# Altium PCB MPPT_Power_Board.PcbDoc (part 1 of 2)
Units mm, origin at the board's own origin, x right, y up, seen from the top; angles counter-clockwise.
Board outline 137.01 x 102.01 mm, 2 copper layers (Top Layer, Bottom Layer), stack 2.14 mm thick; 111 components, 74 nets, 392 pads, 366 vias.
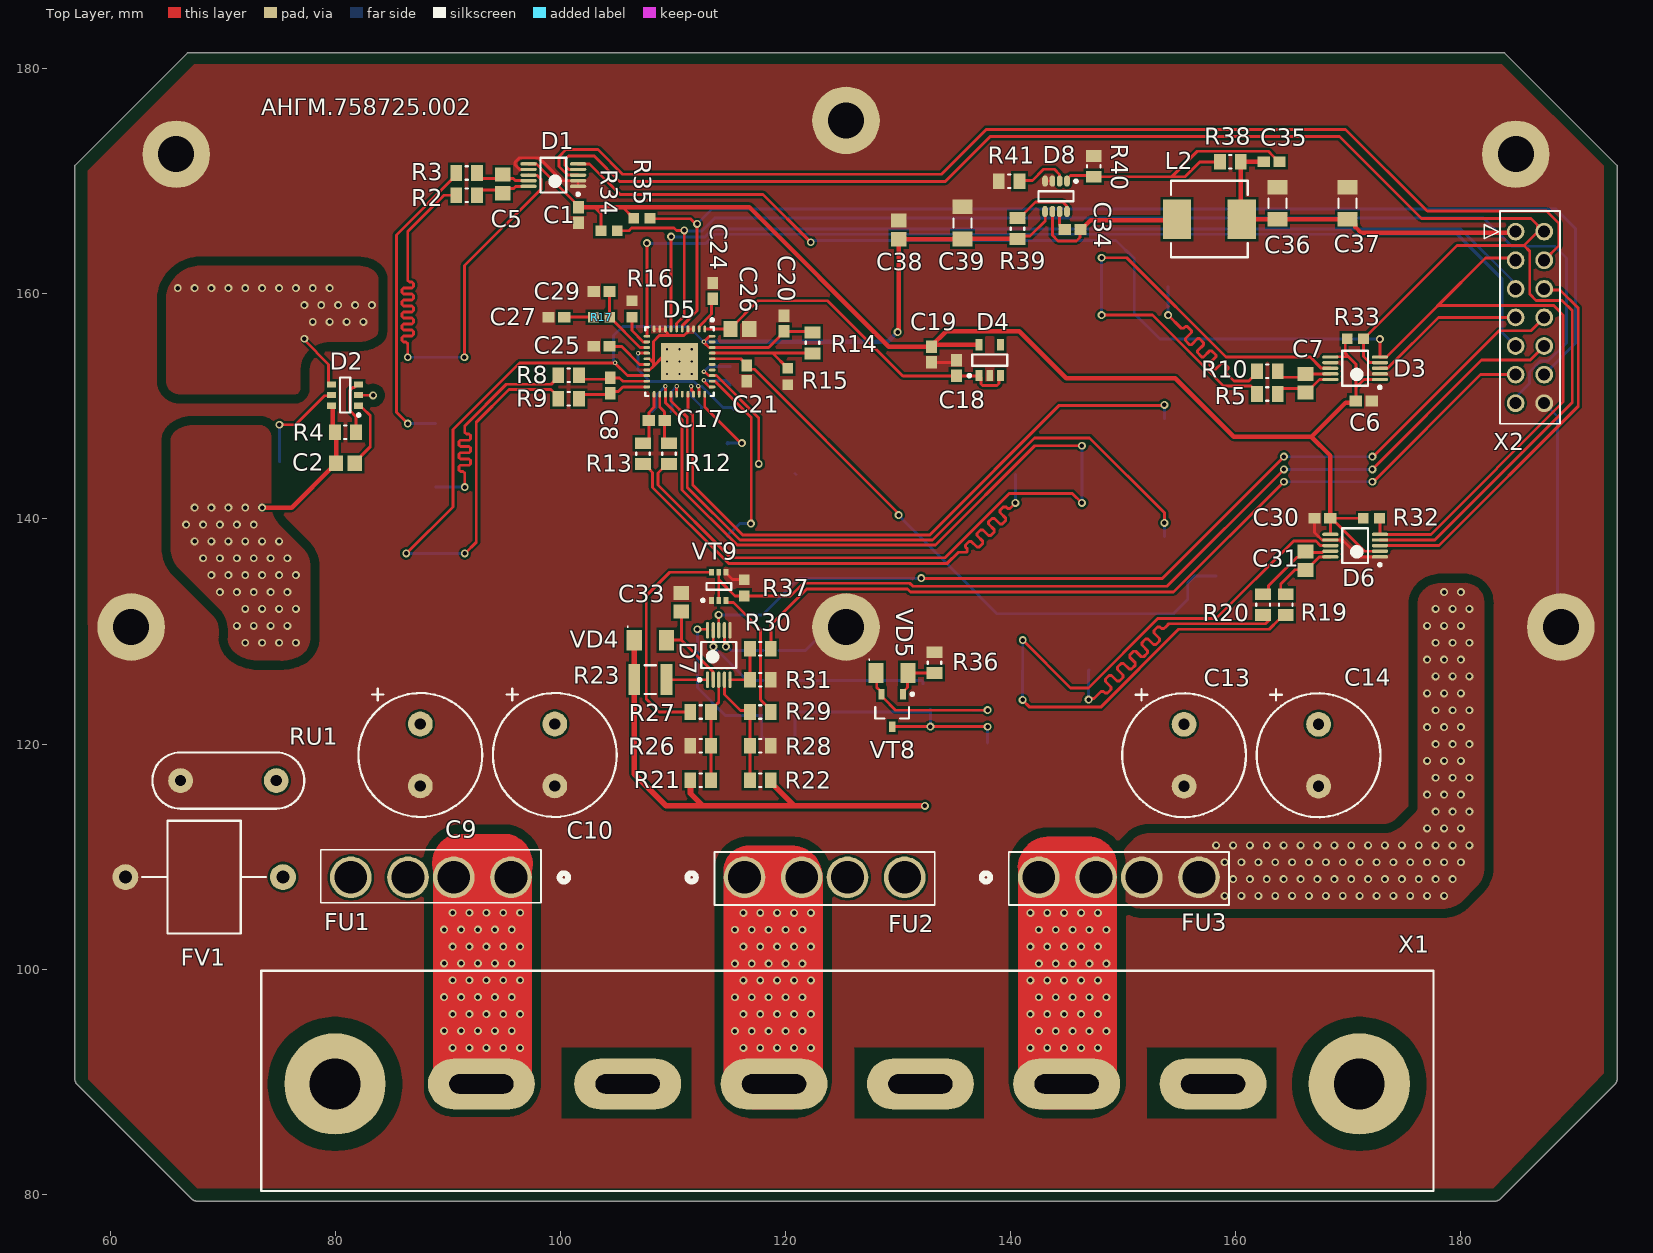
[diagram p0: Top Layer view]
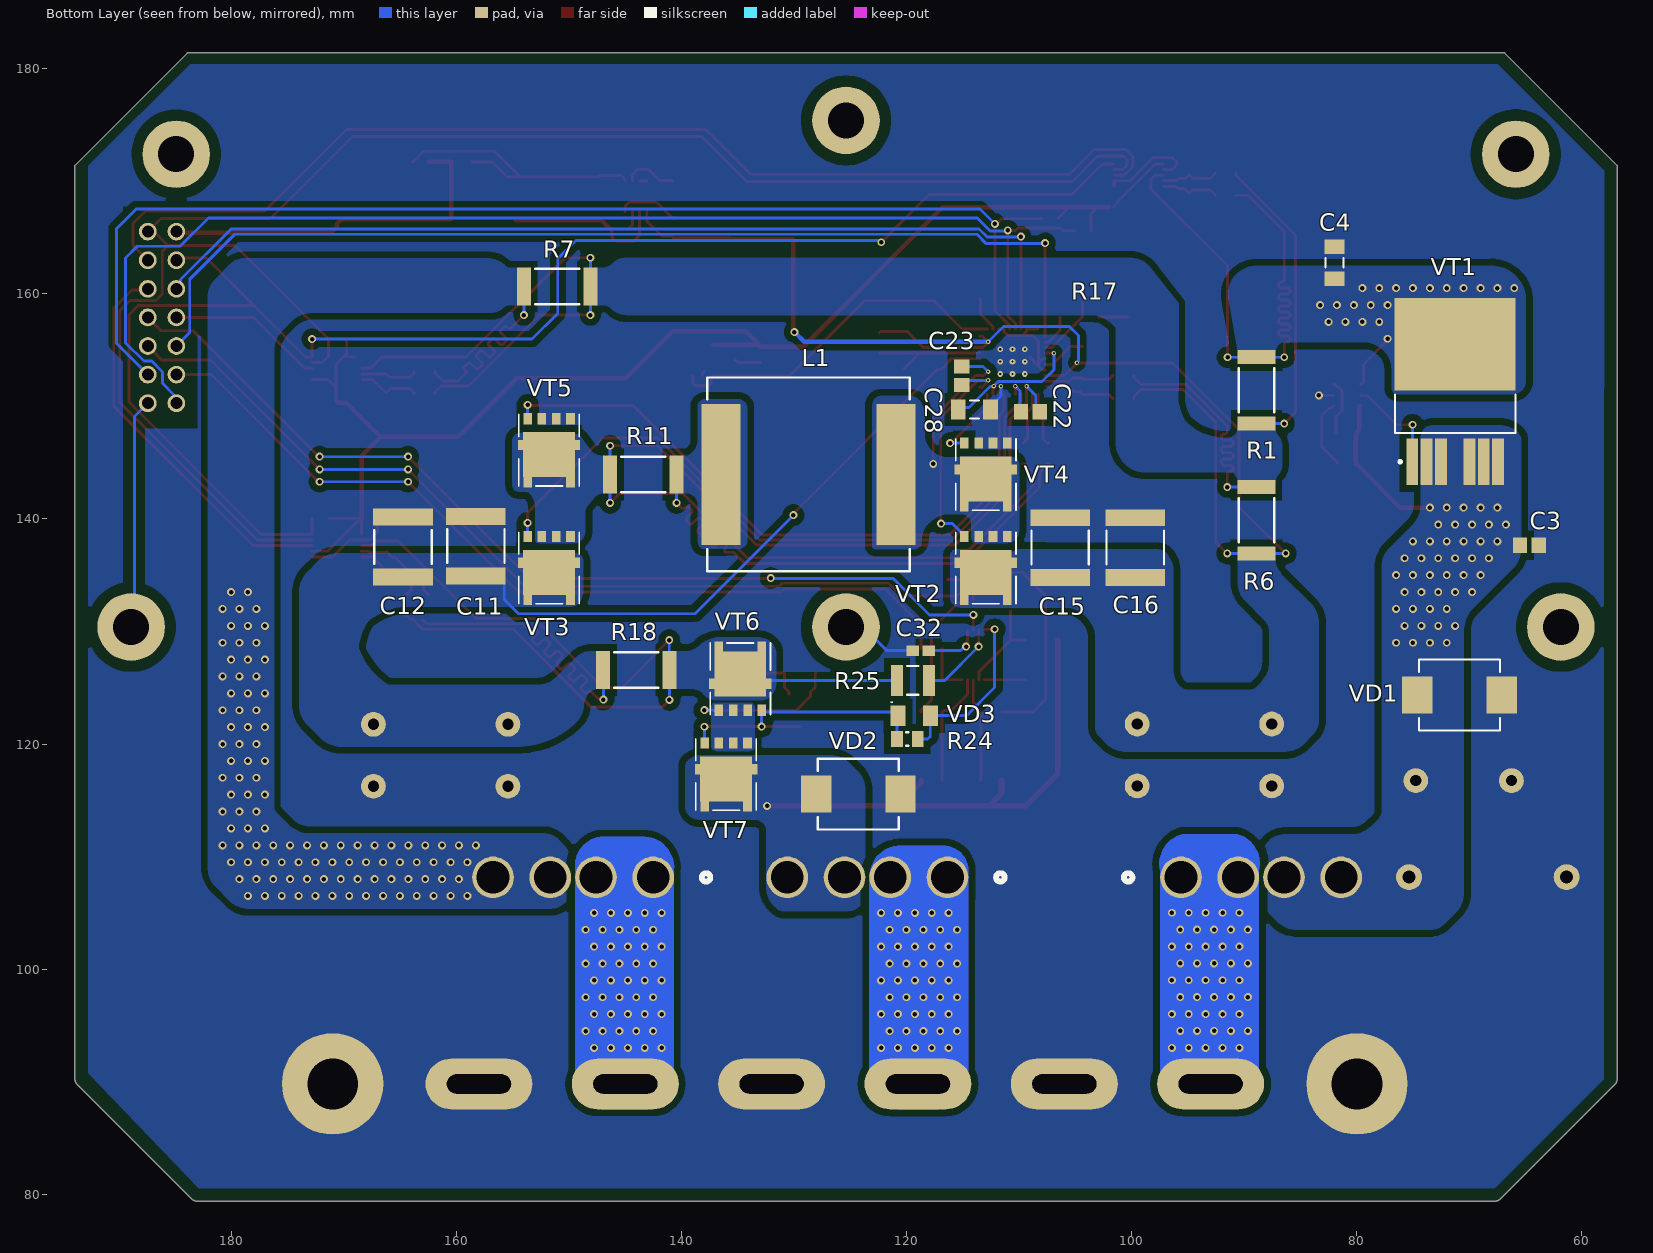
[diagram p1: Bottom Layer view, seen from below]
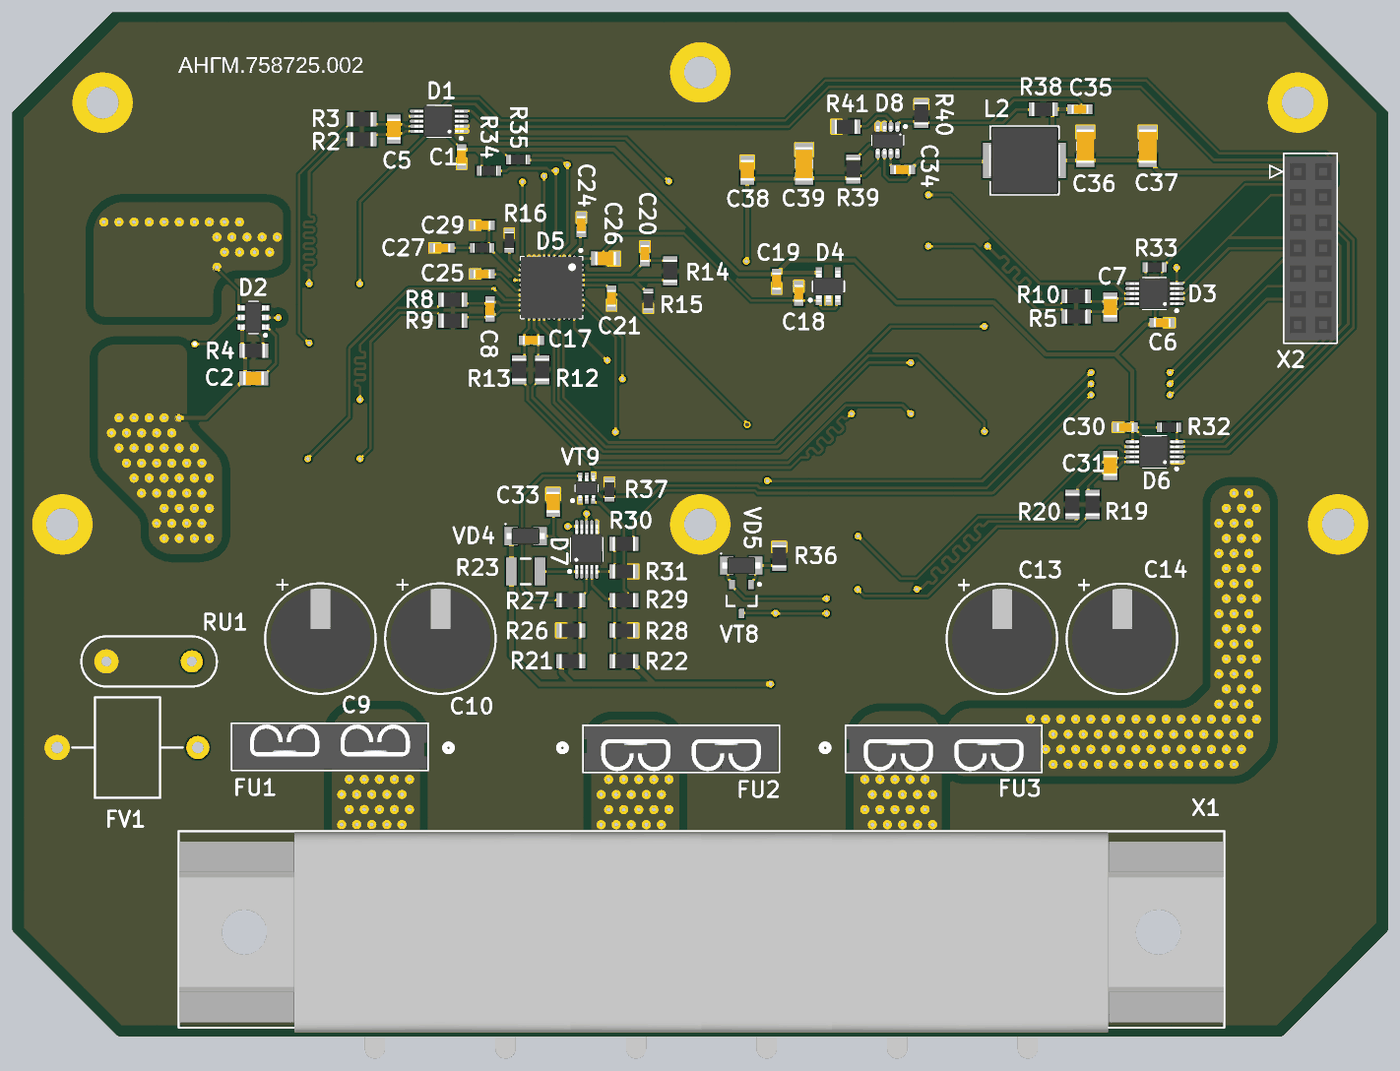
[diagram p3: 3D render of the assembled board from above, using the file's embedded part models]
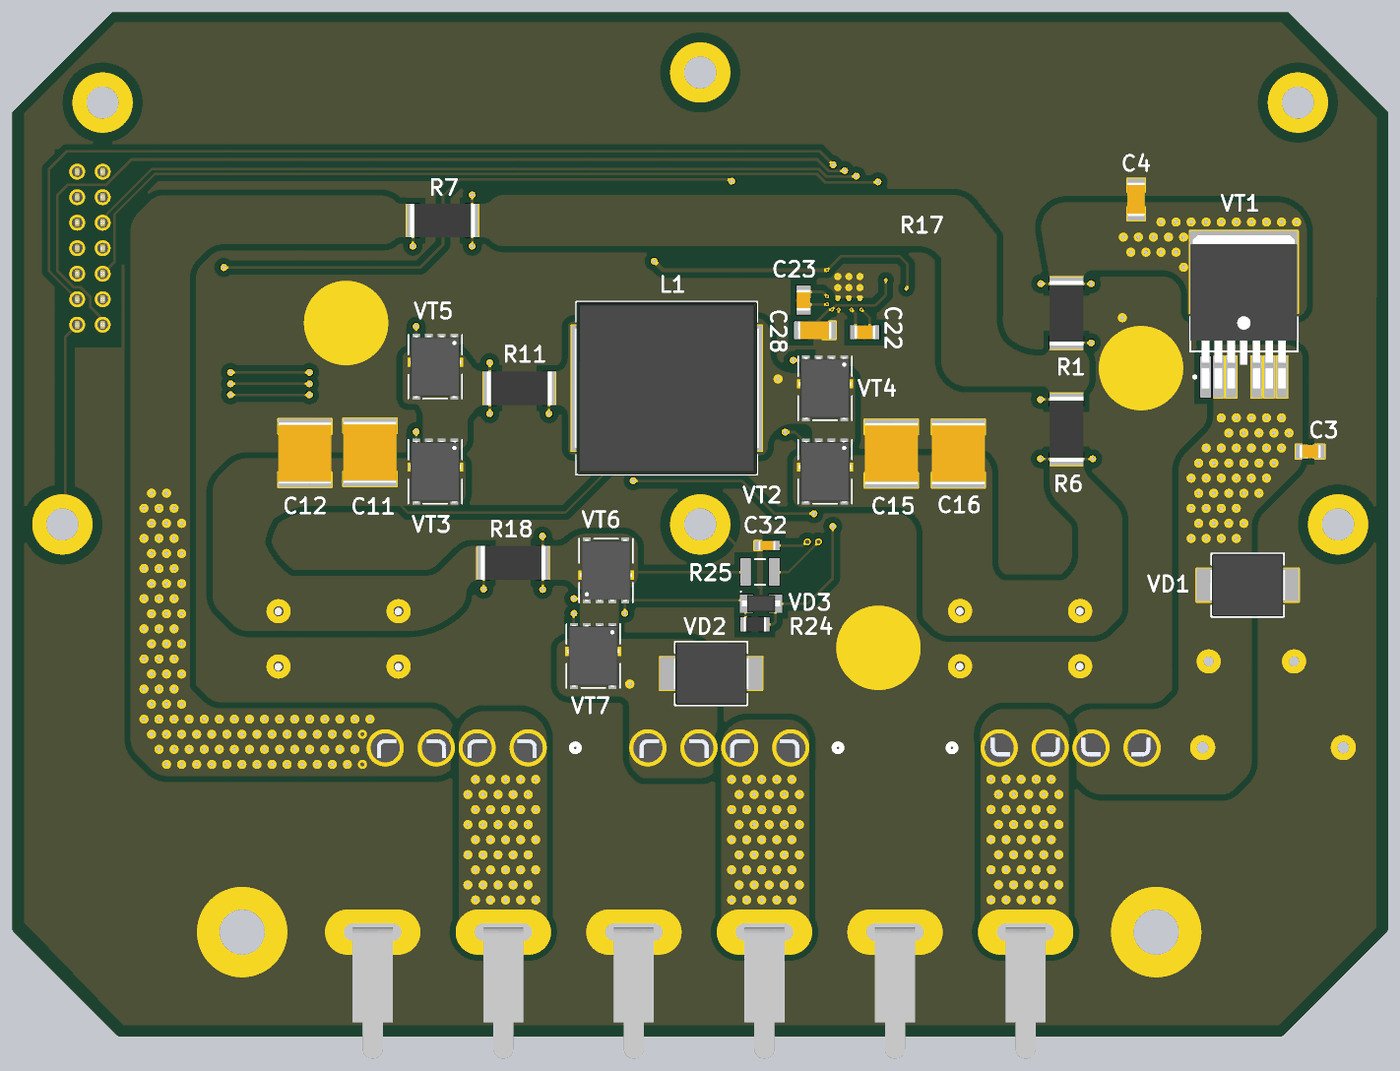
[diagram p4: 3D render of the assembled board from below, using the file's embedded part models]

## Layer stack, top to bottom
Top Solder: solder mask 0.0102, Solder Resist, Dk 3.5
Top Layer: signal copper 0.07
Dielectric 1: dielectric 2, FR-4, Dk 4.8
Bottom Layer: signal copper 0.07
Bottom Solder: solder mask 0.0102, Solder Resist, Dk 3.5

## Board outline
57.069,89.76 cw(c57.569,90.26) 56.862,90.26 56.862,171.394 56.864,171.398 66.864,181.398 66.869,181.4 183.869,181.4 183.873,181.398 193.873,171.398 193.875,171.394 193.875,90.26 cw(c193.169,90.26) 193.668,89.76 183.502,79.594 cw(c183.002,80.094) 183.002,79.387 67.735,79.387 cw(c67.735,80.094) 67.235,79.594

## Design rules (kind name [scope] priority, off if disabled: settings)
Clearance AGND_PGND_Clearence [OnBottomLayer AND (InNet('AGND') OR InNet('PGND'))] p1: gap=0.6 ignorepadtopadclearanceinfootprint=FALSE
Clearance Clearance_tight [InPolygon AND (InNet('SW1') OR InNet('NetD6_8') OR InNet('NetVD5_1') OR InNet('NetC2_2') OR InNet('NetFU2_1') OR InNet('NetFU3_1')) vs InPolygon AND (InNet('BATT_OUT') OR InNet('NetVD5_1') OR InNet('BATT_IN') OR InNet('NetFU1_1') OR InNet('NetFU3_2'))] p2: gap=0.254 ignorepadtopadclearanceinfootprint=FALSE
Clearance Clearence_Poly_to_Poly [InPolygon Or IsRegion vs InPolygon Or IsRegion] p3: gap=0.8 ignorepadtopadclearanceinfootprint=FALSE
Clearance Clearence_AGND_to_PGND [InPolygon AND InNet('AGND') vs InNet('PGND')] p4: gap=0.8 ignorepadtopadclearanceinfootprint=FALSE
Clearance Clearance_Poly_to_evrythning [InPolygon] p5: gap=0.2 ignorepadtopadclearanceinfootprint=FALSE
Clearance Clearance_1 [All] p6: gap=0.254 ignorepadtopadclearanceinfootprint=FALSE
Height Height_Top [IsComponent And TouchesRoom('TOP_HEIGHT_11MM') And OnLayer('Top Layer')] p1: minheight=0 maxheight=11 prefheight=7
Height Height_Bottom [IsComponent And TouchesRoom('BOTTOM_HEIGHT_8MM') And OnLayer('Bottom Layer')] p2: minheight=0 maxheight=8 prefheight=4
Height [All] p3: minheight=0 maxheight=25.4 prefheight=12.7
PolygonConnect [All] p1: connectstyle=Direct reliefconductorwidth=0.254 reliefentries=4 polygonreliefangle="90 Angle" airgapwidth=0.254
RoutingVias [All] p1: holewidth=0.305 width=0.61 viastyle="Through Hole" minholewidth=0.152 minwidth=0.457 maxholewidth=0.711 maxwidth=1.27
SolderMaskExpansion [All] p1: expansion=0.102 istentingtop=FALSE
SupplyNets "Schematic Supply Nets_1" [InNet('AGND')] p1: voltage=0.000
SupplyNets "Schematic Supply Nets" [InNet('3V3')] p2: voltage=0.000
Width Width_1 [All] p1: maxlimit=10 minlimit=0.254 preferedwidth=5 minimp=50.000000 maximp=50.000000 favimp=50.000000
Width Power_width [InNetClass('Power_nets')] p2: maxlimit=20 minlimit=6 preferedwidth=7 minimp=50.000000 maximp=50.000000 favimp=50.000000
29 further rules are at their usual default settings.

## Classes and differential pairs
component class "Лист 2": C30 C31 C32 C33 C34 C35 C36 C37 C38 C39 D6 D7 D8 L2 R18 R19 R20 R21 R22 R23 R24 R25 R26 R27 R28 R29 R30 R31 R32 R33 R34 R35 R36 R37 R38 R39 R40 R41 VD3 VD4 VD5 VT6 VT7 VT8 VT9 X2
component class "Лист 1": C1 C2 C3 C4 C5 C6 C7 C8 C9 C10 C11 C12 C13 C14 C15 C16 C17 C18 C19 C20 C21 C22 C23 C24 C25 C26 C27 C28 C29 D1 D2 D3 D4 D5 FU1 FU2 FU3 FV1 L1 R1 R2 R3 R4 R5 R6 R7 R8 R9 R10 R11 R12 R13 R14 R15 R16 R17 RU1 VD1 VD2 VT1 VT2 VT3 VT4 VT5 X1

## Components (designator, comment, footprint, x,y, rotation, side; value= is the part's Value field where it differs from the comment)
C1 "CL10B104KO8NNNC Samsung Electronics" CC0603 101.6,167 r90 top
C2 "CC0805KKX7R0BB104 Yageo" CC0805 80.9,144.948 r180 top
C3 "CC0805KKX7R0BB104 Yageo" CC0805 64.65,137.65 r0 bottom
C4 "CC1206KKX7R0BB225 Yageo" CC1206 81.975,162.75 r90 bottom
C5 "CC0805KKX7R0BB104 Yageo" CC0805 94.87,169.753 r90 top
C6 "CL10B104KO8NNNC Samsung Electronics" CC0603 171.361,150.476 r180 top
C7 "CC0805KKX7R0BB104 Yageo" CC0805 166.194,152.042 r90 top
C8 "GRM1885C1H102JA01D Murata Electronics" CC0603 104.432,151.844 r270 top
C9 "100ZLH100MEFC10x20 Rubycon" EEUFC2A101 87.55,116.275 r90 top locked
C10 "100ZLH100MEFC10x20 Rubycon" EEUFC2A101 99.5,116.275 r90 top locked
C11 "2220B106K101N05 Hitano" CC2220 158.25,137.575 r270 bottom
C12 "2220B106K101N05 Hitano" CC2220 164.725,137.5 r270 bottom
C13 "100ZLH100MEFC10x20 Rubycon" EEUFC2A101 155.4,116.25 r90 top
C14 "100ZLH100MEFC10x20 Rubycon" EEUFC2A101 167.35,116.25 r90 top
C15 "2220B106K101N05 Hitano" CC2220 106.35,137.45 r90 bottom
C16 "2220B106K101N05 Hitano" CC2220 99.675,137.45 r90 bottom
C17 "GRM1885C1H102JA01D Murata Electronics" CC0603 108.56,148.737 r0 top
C18 "GCM188R71E105KA64D Murata Electronics" CC0603 135.183,153.404 r270 top
C19 "GCM188R71E105KA64D Murata Electronics" CC0603 132.971,154.603 r90 top
C20 "CC0603KRX7R9BB105 Yageo" CC0603 119.86,157.361 r270 top
C21 "CC0603KRX7R9BB105 Yageo" CC0603 116.539,152.923 r90 top
C22 "CC0805KKX7R0BB104 Yageo" CC0805 108.98,149.525 r180 bottom
C23 "CC0805KKX7R0BB104 Yageo" CC0805 115.089,152.723 r90 bottom
C24 "CL10B104KO8NNNC Samsung Electronics" CC0603 113.525,160.25 r90 top
C25 "CL10B473KB8NNNC Samsung Electronics" CC0603 103.657,155.328 r180 top
C26 "CC0805KKX7R7BB475 Yageo" CC0805 115.95,156.875 r0 top
C27 "CC0603JRX7R9BB472 Yageo" CC0603 99.642,157.925 r180 top
C28 "GRM31CR61C226KE15L Murata Electronics" CC1206 113.958,149.725 r0 bottom
C29 "CC0603JRNPO9BN101 Yageo" CC0603 103.657,160.194 r180 top
C30 "CL10B104KO8NNNC Samsung Electronics" CC0603 167.684,140.063 r180 top
C31 "CC0805KKX7R0BB104 Yageo" CC0805 166.194,136.269 r270 top
C32 "GRM188R71C683K Murata Electronics" CC0603 118.725,128.294 r0 bottom
C33 "CC0805KKX7R0BB104 Yageo" CC0805 110.731,132.594 r270 top
C34 "CC0603KRX7R9BB103 Yageo" CC0603 145.506,165.714 r0 top
C35 "CC0603JRNPO9BN220 Yageo" CC0603 163.175,171.725 r0 top
C36 "GRM31CR61C226KE15L Murata Electronics" CC1206 163.7,168.05 r90 top
C37 "GRM31CR61C226KE15L Murata Electronics" CC1206 169.925,168.05 r90 top
C38 "CC0805KKX7R0BB104 Yageo" CC0805 130.056,165.664 r90 top
C39 "CL31B106KBHNNNE Samsung Electronics" CC1206 135.714,166.289 r90 top
D1 "INA237AIDGS Texas Instruments" VSSOP 99.371,170.54 r180 top
D2 "AP74700QW6-7 Diodes Inc" SOT26 80.875,151 r180 top
D3 "INA237AIDGS Texas Instruments" VSSOP 170.6,153.379 r180 top
D4 "ADP150AUJZ-3.3-R7 Analog Devices" "TSOT (UJ-5)" 138.133,154.104 r90 top
D5 "LM51772RHAR Texas Instruments" LM51772 110.575,153.975 r270 top
D6 "INA237AIDGS Texas Instruments" VSSOP 170.6,137.625 r180 top
D7 "LM5060MM/NOPB Texas Instruments" VSSOP 114.068,127.906 r90 top
D8 "SY8303AIC Silergy" TSOT23-8 144.026,168.657 r270 top
FU1 "FT40A.50 Tesla" 3522-2_KEY 95.605,108.15 r180 top
FU2 "0287020L Littelfuse" 3522-2_KEY 116.356,108.15 r0 top locked
FU3 "0287020L Littelfuse" 3522-2_KEY 142.5,108.15 r0 top locked
FV1 "B88069X1380S102 EPCOS" "B88069X1380S102 EPCOS" 73.35,108.175 r180 top
L1 "SRP1770TA-4R7M Bourns" SRP1770TA 128.7,143.95 r0 bottom
L2 "IHLP2525CZER100M01 Vishay" IHLP2525CZER100M01 157.648,166.632 r0 top
R1 "PMR100HZPFV1L00 Pohm" RC2512 88.9,151.425 r270 bottom value="1 мОм"
R2 "RC0805JR-0710RL Yageo" RC0805 91.675,168.744 r0 top value="10 Ом"
R3 "RC0805JR-0710RL Yageo" RC0805 91.675,170.724 r180 top value="10 Ом"
R4 "RC0805JR-07100KL Yageo" RC0805 80.9,147.7 r0 top value="100 кОм"
R5 "RC0805JR-0710RL Yageo" RC0805 162.804,151.091 r0 top value="10 Ом"
R6 "FMF25FPJR003-BH Prosperity Dielectrics" RC2512 88.9,139.875 r270 bottom value="3 мОм"
R7 "RLM25FECR002 TA-I" RC2512 151.025,160.65 r0 bottom value="2 мОм"
R8 "RC0805JR-0710RL Yageo" RC0805 100.732,152.761 r0 top value="10 Ом"
R9 "RC0805JR-0710RL Yageo" RC0805 100.732,150.673 r0 top value="10 Ом"
R10 "RC0805JR-0710RL Yageo" RC0805 162.804,153.106 r0 top value="10 Ом"
R11 "RLM25FECR002 TA-I" RC2512 143.375,143.95 r0 bottom value="2 мОм"
R12 "RC0805JR-0710RL Yageo" RC0805 109.65,145.8 r90 top value="10 Ом"
R13 "RC0805JR-0710RL Yageo" RC0805 107.325,145.8 r90 top value="10 Ом"
R14 "RC0805FR-0768KL Yageo" RC0805 122.386,155.628 r270 top value="68 кОм"
R15 "RT0603BRD0710KL Yageo" RC0603 120.2,152.65 r270 top value="10 кОм"
R16 "RC0603FR-0778K7L Yageo" RC0603 106.35,158.65 r90 top value="78,7 кОм"
R17 "RT0603BRD0710KL Yageo" RC0603 103.657,157.925 r180 top value="10 кОм"
R18 "RLM25FECR002 TA-I" RC2512 144,126.575 r0 bottom value="2 мОм"
R19 "RC0805JR-0710RL Yageo" RC0805 164.425,132.375 r270 top value="10 Ом"
R20 "RC0805JR-0710RL Yageo" RC0805 162.425,132.375 r270 top value="10 Ом"
R21 "RC0805FR-07100KL Yageo" RC0805 112.462,116.771 r0 top value="100 кОм"
R22 "RC0805FR-07100KL Yageo" RC0805 117.766,116.771 r180 top value="100 кОм"
R23 "RC1210FR-0716K9L Yageo" RC1210 107.986,125.714 r0 top value="16,9 кОм"
R24 "RC0805JR-072KL Yageo" RC0805 119.925,120.437 r0 bottom value="2 кОм"
R25 "RC1210JR-0710KL Yageo" RC1210 119.425,125.65 r0 bottom value="10 кОм"
R26 "RC0805FR-0715K4L Yageo" RC0805 112.462,119.843 r180 top value="15,4 кОм"
R27 "RC0805FR-0713K3L Yageo" RC0805 112.462,122.846 r180 top value="13,3 кОм"
R28 "RC0805FR-0719K1L Yageo" RC0805 117.766,119.843 r0 top value="19,1 кОм"
R29 "RC0805FR-0715K4L Yageo" RC0805 117.766,122.846 r0 top value="15,4 кОм"
R30 "RC0805JR-074K7L Yageo" RC0805 117.766,128.46 r0 top value="4,7 кОм"
R31 "RC0805JR-07100KL Yageo" RC0805 117.766,125.714 r0 top value="100 кОм"
R32 "RC0603FR-072K2L Yageo" RC0603 172.043,140.06 r180 top value="2,2 кОм"
R33 "RC0603FR-072K2L Yageo" RC0603 170.625,155.993 r180 top value="2,2 кОм"
R34 "RC0603FR-072K2L Yageo" RC0603 104.321,165.597 r180 top value="2,2 кОм"
R35 "RC0603FR-072K2L Yageo" RC0603 107.233,166.714 r180 top value="2,2 кОм"
R36 "RC0805JR-0710KL Yageo" RC0805 133.225,127.225 r90 top value="10 кОм"
R37 "RT0603BRD0710KL Yageo" RC0603 116.325,133.875 r90 top value="10 кОм"
R38 "RC0805FR-0768K1L Yageo" RC0805 159.516,171.725 r180 top value="68,1 кОм"
R39 "RC0805JR-07100KL Yageo" RC0805 140.606,165.796 r270 top value="100 кОм"
R40 "RC0805FR-0712KL Yageo" RC0805 147.384,171.314 r90 top value="12 кОм"
R41 "RC0805FR-07200KL Yageo" RC0805 139.856,170 r0 top value="200 кОм"
RU1 "Варистор 14D680K Yageo" 14D680K 74.75,116.75 r180 top
VD1 "SMCJ51CA Littelfuse" DO-214AB 70.875,124.35 r0 bottom
VD2 "SMCJ30CA Hottech" DO-214AB 124.275,115.55 r180 bottom
VD3 "Диод 1N4148W Diotec Semiconductor" SOD-123F 119.31,122.517 r180 bottom
VD4 "Диод 1N4148W Diotec Semiconductor" SOD-123F 107.986,129.227 r0 top
VD5 "Диод 1N4148W Diotec Semiconductor" SOD-123F 129.45,126.3 r0 top
VT1 "IRFS7730TRL7PP Infineon Technologies" D2PAK-7PIN 71.25,151.325 r90 bottom
VT2 "NTMFS5C628NLT1G ON Semiconductor" "DFN5 (SO-8FL)" 112.945,135.645 r270 bottom
VT3 "NTMFS5C628NLT1G ON Semiconductor" "DFN5 (SO-8FL)" 151.75,135.645 r270 bottom
VT4 "NTMFS5C628NLT1G ON Semiconductor" "DFN5 (SO-8FL)" 112.945,143.945 r270 bottom
VT5 "NTMFS5C628NLT1G ON Semiconductor" "DFN5 (SO-8FL)" 151.75,146.098 r270 bottom
VT6 "NTMFS5C628NLT1G ON Semiconductor" "DFN5 (SO-8FL)" 134.75,125.8 r90 bottom
VT7 "NTMFS5C628NLT1G ON Semiconductor" "DFN5 (SO-8FL)" 136.025,117.3 r270 bottom
VT8 "MMBT5551LT1G ON Semiconductor" SOT-23-3 129.475,122.975 r270 top
VT9 "BSS138DW-7-F Diodes Inc" SOT363 114.067,134.006 r90 top
X1 "DG78H-A-06P-13-00A(H) Degson Electronics" DG78H-A-06P-13-00A(H) 92.975,89.8 r0 top locked
X2 "DS1023-2x7 Connfly electronic" PBD-2X7 184.856,165.516 r90 top locked

## Footprints (in the part's own frame and the unit in brackets; to place one, negate y for a bottom-side part, rotate by r counter-clockwise, add the part's x,y. Pads: shape width x height; smd on the part's side, far side on the other; paste and mask are expansions set on the pad)
14D680K [mm]
  round 2.2 hole 1: 1(0,0) 2(8.5,0)
  silkscreen extent -2.5,-2.5 11,2.5
3522-2_KEY [mm]
  round 3.7 hole 2.9 paste-2539.97 mask+0: 1(0,0) 1(5.08,0) 2(9.144,0) 2(14.224,0)
  silkscreen extent -5.08,-2.45 16.89,2.25, body extent -2.55,-2.32 16.75,2.12, height 7.62
"B88069X1380S102 EPCOS" [mm]
  round 2.3 hole 1.15: 1(-2,0) 2(12,0)
  silkscreen extent -0.5,-5 10.5,5
CC0603 [mm] "Chip Capacitor, 2-Leads, Body 1,60x0,80mm, IPC Medium Density"
  rect 1.1x0.95 smd: 1(-0.7,0) 2(0.7,0)
  body extent -0.85,-0.45 0.85,0.45, height 0.9
CC0805 [mm] "Chip Capacitor, 2-Leads, Body 2,00x1,25mm, IPC Medium Density"
  rect 1.25x1.4 smd: 1(-0.825,0) 2(0.825,0)
  body extent -1.05,-0.67 1.05,0.67, height 0.7
CC1206 [mm] "Chip Capacitor, 2-Leads, Body 3,20x1,60mm, IPC Medium Density"
  rect 1.3x1.8 smd: 1(-1.425,0) 2(1.425,0)
  silkscreen extent -0.4,-0.8 0.4,0.8, body extent -1.68,-0.87 1.68,0.87, height 0.95
CC2220 [mm] "Chip Capacitor, 2-Leads, Body 5,70x5,00mm, IPC Medium Density"
  rect 1.5x5.3 smd: 1(-2.65,0) 2(2.65,0)
  silkscreen extent -1.5,-2.55 1.5,2.55, body extent -3.05,-2.65 3.05,2.65, height 1.25
D2PAK-7PIN [mm] "D2-PAK, 7-Pads, Body 7,93x8,70mm (max), IPC Medium Density"
  rect 4.15x1.05 smd: 1(-6.25,3.81) 3(-6.25,-3.81) 3(-6.25,-2.54) 3(-6.25,-1.27) 3(-6.25,1.27) 3(-6.25,2.54)
  rect 8.2x10.75 smd: 2(4.2,0)
  silkscreen extent -6.37,-5.35 -0.3,5.35, body extent -7.41,-5.33 7.84,5.33, height 5.21
"DFN5 (SO-8FL)" [mm]
  rect 0.991x0.762 smd paste+0 mask+0: 1(-2.795,-1.905) 2(2.795,-1.905) 2(2.795,1.905) 3(-2.795,-0.635) 3(-2.795,0.635) 3(-2.795,1.905)
  rect 0.905x0.495 smd paste-2539.97 mask+0: 2(-0.452,-2.525) 2(-0.452,2.525)
  rect 4x4.59 smd paste-2539.97 mask+0: 2(0.4,0)
  silkscreen extent -3.18,-2.68 3.18,2.68, body extent -3.08,-2.58 3.08,2.58, height 1.11
DG78H-A-06P-13-00A(H) [mm]
  oval 9.5x4.5 hole 1.7 slot 5.7 at 0 deg paste-2539.97 mask+0: 1(0,0) 1(0,0) 2(13,0) 3(26,0) 4(39,0) 5(52,0) 6(65,0)
  round 9 hole 4.5 paste-2539.97 mask+0: ""(-13,0) ""(78,0)
  silkscreen extent -19.55,-9.5 84.57,10.05, body extent -19.5,-12.6 84.5,10, height 22.01
DO-214AB [mm] "Molded Capacitor, 2-Leads, Body 6,86x5,91mm, IPC Medium Density"
  rect 2.7x3.3 smd: 1(-3.75,0) 2(3.75,0)
  silkscreen extent -3.6,-3.15 3.6,3.15, body extent -3.77,-3.11 3.77,3.11, height 2.62
EEUFC2A101 [mm]
  round 2.2 hole 1: 1(0,0) 2(5.5,0)
  silkscreen extent -2.75,-5.5 8.62,5.5, body extent -2.29,-5.02 7.74,4.98, height 19.95
IHLP2525CZER100M01 [mm] "Molded Inductor, 2-Leads, Body 6,47x6,47mm, IPC Medium Density"
  rect 2.5x3.5 smd: 1(-2.877,0) 2(2.877,0)
  silkscreen extent -3.4,-3.4 3.4,3.4, body extent -3.58,-3.36 3.58,3.36, height 3
LM51772 [mm] "PQFN, 40-Leads, Body 6,00x6,00mm, Pitch 0,50mm, Thermal Pad 3,30x3,30mm, IPC Medium Density"
  oval 0.6x0.25 smd: 1(-2.9,2.25) 2(-2.9,1.75) 3(-2.9,1.25) 4(-2.9,0.75) 5(-2.9,0.25) 6(-2.9,-0.25) 7(-2.9,-0.75) 8(-2.9,-1.25) 9(-2.9,-1.75) 10(-2.9,-2.25) 21(2.9,-2.25) 22(2.9,-1.75) 23(2.9,-1.25) 24(2.9,-0.75) 25(2.9,-0.25) 26(2.9,0.25) 27(2.9,0.75) 28(2.9,1.25) 29(2.9,1.75) 30(2.9,2.25)
  oval 0.25x0.6 smd: 11(-2.25,-2.9) 12(-1.75,-2.9) 13(-1.25,-2.9) 14(-0.75,-2.9) 15(-0.25,-2.9) 16(0.25,-2.9) 17(0.75,-2.9) 18(1.25,-2.9) 19(1.75,-2.9) 20(2.25,-2.9) 31(2.25,2.9) 32(1.75,2.9) 33(1.25,2.9) 34(0.75,2.9) 35(0.25,2.9) 36(-0.25,2.9) 37(-0.75,2.9) 38(-1.25,2.9) 39(-1.75,2.9) 40(-2.25,2.9)
  rect 3.3x3.3 smd: 41(0,0)
  silkscreen extent -3.82,-3.05 3.05,3.05, body extent -3.05,-3.05 3.05,3.05, height 1
PBD-2X7 [mil]
  round 62 / inner round 60 / far side round 62 hole 42 paste-99999 mask+0: 1(0,0) 2(0,-100) 3(-100,0) 4(-100,-100) 5(-200,0) 6(-200,-100) 7(-300,0) 8(-300,-100) 9(-400,0) 10(-400,-100) 11(-500,0) 12(-500,-100) 13(-600,0) 14(-600,-100)
  silkscreen extent -672,-155 72,110, body extent -660,-150 60,50, height 335
RC0603 [mm] "Chip Resistor, 2-Leads, Body 1,60x0,85mm, IPC Medium Density"
  rect 0.95x0.95 smd: 1(-0.725,0) 2(0.725,0)
  body extent -0.85,-0.48 0.85,0.48, height 0.5
RC0805 [mm] "Chip Resistor, 2-Leads, Body 2,10x1,30mm, IPC Medium Density"
  rect 1.05x1.4 smd: 1(-0.925,0) 2(0.925,0)
  silkscreen extent -0.1,-0.6 0.1,0.6, body extent -1.1,-0.7 1.1,0.7, height 0.55
RC1210 [mm] "Chip Resistor, 2-Leads, Body 3,10x2,60mm, IPC Medium Density"
  rect 1.05x2.75 smd: 1(-1.425,0) 2(1.425,0)
  silkscreen extent -0.5,-1.27 0.5,1.28, body extent -1.6,-1.37 1.6,1.38, height 0.65
RC2512 [mm] "Chip Resistor, 2-Leads, Body 6,35x3,20mm, IPC Medium Density"
  rect 1.25x3.35 smd: 1(-2.95,0) 2(2.95,0)
  silkscreen extent -1.95,-1.58 1.95,1.58, body extent -3.22,-1.68 3.22,1.68, height 0.65
SOD-123F [mm] "SODFL, 2-Leads, Body 1,60x3,80mm, IPC Medium Density"
  rect 1.34x1.8 smd: 1(-1.43,0) 2(1.43,0)
  silkscreen extent -2.05,1.15 -1.95,1.25, body extent -1.9,-0.85 1.9,0.85, height 1.2
SOT26 [mm] "SOT23, 6-Leads, Body 3,00x2,85mm, Pitch 0,95mm, IPC Medium Density"
  rect 0.8x0.55 smd: 1(-1.2,0.95) 2(-1.2,0) 3(-1.2,-0.95) 4(1.2,-0.95) 5(1.2,0) 6(1.2,0.95)
  silkscreen extent -1.33,-1.55 0.45,1.9, body extent -1.5,-1.55 1.5,1.55, height 1.4
SOT363 [mm] "SOT23, 6-Leads, Body 2,00x2,23mm, Pitch 0,65mm, IPC Medium Density"
  rect 0.6x0.42 smd: 1(-1.25,0.65) 2(-1.25,0) 3(-1.25,-0.65) 4(1.25,-0.65) 5(1.25,0) 6(1.25,0.65)
  silkscreen extent -1.37,-1.1 0.3,1.53, body extent -1.22,-1.1 1.22,1.1, height 1.1
SOT-23-3 [mm] "SOT23, 3-Leads, Body 2,92x2,37mm, Pitch 0,95mm, IPC Medium Density"
  rect 0.95x0.56 smd: 1(-1.45,0.95) 2(-1.45,-0.95) 3(1.45,0)
  silkscreen extent -1.57,-1.5 0.7,1.91, body extent -0.7,-1.52 0.7,1.52, height 1.11
SRP1770TA [mm] "Molded Inductor, 2-Leads, Body 17,60x16,90mm, IPC Medium Density"
  rect 3.45x12.5 smd: 1(-7.775,0) 2(7.775,0)
  silkscreen extent -9,-8.6 9,8.6, body extent -9.22,-8.6 9.22,8.6, height 7
TSOT23-8 [mm] "TSOP, 8-Leads, Body 2,90x1,60mm, Pitch 0,65mm, IPC Medium Density"
  oval 1x0.5 smd: 1(-1.35,0.975) 2(-1.35,0.325) 3(-1.35,-0.325) 4(-1.35,-0.975) 5(1.35,-0.975) 6(1.35,-0.325) 7(1.35,0.325) 8(1.35,0.975)
  silkscreen extent -1.47,-1.55 0.45,1.9, body extent -1.4,-1.55 1.4,1.55, height 1.1
"TSOT (UJ-5)" [mm] "SOT23, 5-Leads, Body 2,90x2,80mm, Pitch 0,95mm, IPC Medium Density"
  rect 1x0.6 smd: 1(-1.375,0.95) 2(-1.375,0) 3(-1.375,-0.95) 4(1.375,-0.95) 5(1.375,0.95)
  silkscreen extent -1.5,-1.55 0.5,1.92, body extent -1.53,-1.53 1.53,1.53, height 1
VSSOP [mm] "TSSOP, 10-Leads, Body 3,00x3,00mm, Pitch 0,50mm, IPC Medium Density"
  oval 1.45x0.3 smd: 1(-2.2,1) 2(-2.2,0.5) 3(-2.2,0) 4(-2.2,-0.5) 5(-2.2,-1) 6(2.2,-1) 7(2.2,-0.5) 8(2.2,0) 9(2.2,0.5) 10(2.2,1)
  silkscreen extent -2.33,-1.55 1.15,1.82, body extent -2.45,-1.55 2.45,1.55, height 1.1

## Part data
C1 C6 C24: library part C, Capacitance=0,1мк, Manufacturer="Samsung Electronics", PartNumber=CL10B104KO8NNNC, ComponentKind=Конденсатор, Наименование="CL10B104KO8NNNC Samsung Electronics"
C2: library part C, "Керамический, 50В, X7R", Capacitance=0,1мк, Manufacturer=Yageo, PartNumber=CC0805KKX7R0BB104, ComponentKind=Конденсатор, Наименование="CC0805KKX7R0BB104 Yageo"
C3: library part C, "Керамический, 100В, X7R", Capacitance=0,1мк, Manufacturer=Yageo, PartNumber=CC0805KKX7R0BB104, ComponentKind=Конденсатор, Наименование="CC0805KKX7R0BB104 Yageo"
C4: library part C, Capacitance=2,2мк, Manufacturer=Yageo, PartNumber=CC1206KKX7R0BB225, ComponentKind=Конденсатор, Наименование="CC1206KKX7R0BB225 Yageo"
C5: library part C, "Керамический", Capacitance=0,1мк, Manufacturer=Yageo, PartNumber=CC0805KKX7R0BB104, ComponentKind=Конденсатор, Наименование="CC0805KKX7R0BB104 Yageo"
C7 C31: library part C, Capacitance=0,1мк, Manufacturer=Yageo, PartNumber=CC0805KKX7R0BB104, ComponentKind=Конденсатор, Наименование="CC0805KKX7R0BB104 Yageo"
C8: library part C, Capacitance=1000, Manufacturer="Murata Electronics", PartNumber=GRM1885C1H102JA01D, ComponentKind=Конденсатор, Наименование="GRM1885C1H102JA01D Murata Electronics"
C9 C10 C13 C14: library part C_POL, Capacitance=100мк, Manufacturer=Rubycon, PartNumber=100ZLH100MEFC10x20, ComponentKind=Конденсатор, Наименование="100ZLH100MEFC10x20 Rubycon"
C11 C12 C15 C16: library part C, Capacitance=10мк, Manufacturer=Hitano, PartNumber=2220B106K101N05, ComponentKind=Конденсатор, Наименование="2220B106K101N05 Hitano"
C17: library part C, "Керамический", Capacitance=1000, Manufacturer="Murata Electronics", PartNumber=GRM1885C1H102JA01D, ComponentKind=Конденсатор, Наименование="GRM1885C1H102JA01D Murata Electronics"
C18: library part C, "Керами", Capacitence=1мк, Manufacturer="Murata Electronics", PartNumber=GCM188R71E105KA64D, ComponentKind=Конденсатор, Наименование="GCM188R71E105KA64D Murata Electronics"
C19: library part C, "Керамический, от 10В", Capacitence=1мк, Manufacturer="Murata Electronics", PartNumber=GCM188R71E105KA64D, ComponentKind=Конденсатор, Наименование="GCM188R71E105KA64D Murata Electronics"
C20 C21: library part C, "Керамический, 50В", Capacitance=1мк, Manufacturer=Yageo, PartNumber=CC0603KRX7R9BB105, ComponentKind=Конденсатор, Наименование="CC0603KRX7R9BB105 Yageo"
C22 C23: library part C, "Керамика, 50В", Capacitance=0,1мк, Manufacturer=Yageo, PartNumber=CC0805KKX7R0BB104, ComponentKind=Конденсатор, Наименование="CC0805KKX7R0BB104 Yageo"
C25: library part C, "Керамический, X7R или NP0/COG", Capacitance=47000, Manufacturer="Samsung Electronics", PartNumber=CL10B473KB8NNNC, ComponentKind=Конденсатор, Наименование="CL10B473KB8NNNC Samsung Electronics"
C26: library part C, "Керамический, X7R, 10-16В", Capacitance=4,7мк, Manufacturer=Yageo, PartNumber=CC0805KKX7R7BB475, ComponentKind=Конденсатор, Наименование="CC0805KKX7R7BB475 Yageo"
C27: library part C, Capacitance=4700, Manufacturer=Yageo, PartNumber=CC0603JRX7R9BB472, ComponentKind=Конденсатор, Наименование="CC0603JRX7R9BB472 Yageo"
C28: library part C, "Керамический, X7R (X5R), 10-16В", Capacitance=22мк, Manufacturer="Murata Electronics", PartNumber=GRM31CR61C226KE15L, ComponentKind=Конденсатор, Наименование="GRM31CR61C226KE15L Murata Electronics"
C29: library part C, "Керамический, NP0 (COG)", Capacitance=100, Manufacturer=Yageo, PartNumber=CC0603JRNPO9BN101, ComponentKind=Конденсатор, Наименование="CC0603JRNPO9BN101 Yageo"
C30: library part C, Capacitence=0,1мк, Manufacturer="Samsung Electronics", PartNumber=CL10B104KO8NNNC, ComponentKind=Конденсатор, Наименование="CL10B104KO8NNNC Samsung Electronics"
C32: library part C, Capacitence=0,068мк, Manufacturer="Murata Electronics", PartNumber=GRM188R71C683K, ComponentKind=Конденсатор, Наименование="GRM188R71C683K Murata Electronics"
C33: library part C, Capacitence=0,1мк, Manufacturer=Yageo, PartNumber=CC0805KKX7R0BB104, ComponentKind=Конденсатор, Наименование="CC0805KKX7R0BB104 Yageo"
C34: library part C, "Керамический, 50В, 0603", Capacitence=10000, Manufacturer=Yageo, PartNumber=CC0603KRX7R9BB103, ComponentKind=Конденсатор, Наименование="CC0603KRX7R9BB103 Yageo"
C35: library part C, "Керамический, 16В, NPO (COG), от 16В, 0603,0402.", Capacitence=22, Manufacturer=Yageo, PartNumber=CC0603JRNPO9BN220, ComponentKind=Конденсатор, Наименование="CC0603JRNPO9BN220 Yageo"
C36 C37: library part C, "Керамический, 16В, 0805", Capacitence=22мк, Manufacturer="Murata Electronics", PartNumber=GRM31CR61C226KE15L, ComponentKind=Конденсатор, Наименование="GRM31CR61C226KE15L Murata Electronics"
C38: library part C, "Керамический, 50В, 0603", Capacitence=0,1мк, Manufacturer=Yageo, PartNumber=CC0805KKX7R0BB104, ComponentKind=Конденсатор, Наименование="CC0805KKX7R0BB104 Yageo"
C39: library part C, "Керамический, 50В, X7R, корпус 1206", Capacitence=10мк, Manufacturer="Samsung Electronics", PartNumber=CL31B106KBHNNNE, ComponentKind=Конденсатор, Наименование="CL31B106KBHNNNE Samsung Electronics"
D1 D3 D6: library part INA237AIDGSR, "85-V, 16-bit, I2C output current/voltage/power monitor with alert 10-VSSOP -40 to 125", Manufacturer="Texas Instruments", PartNumber=INA237AIDGS, ComponentKind=Микросхема, Copyright="Copyright (C) 2026 Ultra Librarian. All rights reserved.", Manufacturer_Name="Texas Instruments", Manufacturer_Part_Number=INA237AIDGSR, RefDes=RefDes, Type=Type, Наименование="INA237AIDGS Texas Instruments"
D2: library part AP74700QW6-7, "Description", Manufacturer="Diodes Inc", ComponentKind=Микросхема, Copyright="Copyright (C) 2025 Ultra Librarian. All rights reserved.", Manufacturer_Name="Diodes Inc", Manufacturer_Part_Number=AP74700QW6-7, PartNumber=AP74700QW6-7, RefDes=RefDes, Type=Type, Наименование="AP74700QW6-7 Diodes Inc"
D4: library part ADP150AUJZ-3.3-R7, "Ultralow Noise, 150 mA CMOS Linear Regulator", Manufacturer="Analog Devices", Manufacturer_Name="Analog Devices Inc", ComponentKind=Микросхема, Copyright="Copyright (C) 2025 Ultra Librarian. All rights reserved.", Manufacturer_Part_Number=ADP150AUJZ-3.3-R7, PartNumber=ADP150AUJZ-3.3-R7, RefDes=RefDes, Type=Type, Наименование="ADP150AUJZ-3.3-R7 Analog Devices"
D5: library part LM51772RHAR, "55V wide VIN four-switch buck-boost controller with I2C interface 40-VQFN -40 to 125", Manufacturer="Texas Instruments", ComponentKind=Микросхема, Copyright="Copyright (C) 2025 Ultra Librarian. All rights reserved.", Manufacturer_Name="Texas Instruments", Manufacturer_Part_Number=LM51772RHAR, PartNumber=LM51772RHAR, RefDes=RefDes, Type=Type, Наименование="LM51772RHAR Texas Instruments"
D7: library part LM5060MMNOPB, "5.5-V to 65-V high side protection controller 10-VSSOP -40 to 125", Manufacturer="Texas Instruments", Manufacturer_Part_Number=LM5060MM/NOPB, ComponentKind=Микросхема, Copyright="Copyright (C) 2025 Ultra Librarian. All rights reserved.", Manufacturer_Name="Texas Instruments", PartNumber=LM5060MM/NOPB, RefDes=RefDes, Type=Type, Наименование="LM5060MM/NOPB Texas Instruments"
D8: library part SY8303AIC, "Description", Manufacturer=Silergy, ComponentKind=Микросхема, Copyright="Copyright (C) 2025 Ultra Librarian. All rights reserved.", Manufacturer_Name=Silergy, Manufacturer_Part_Number=SY8303AIC, PartNumber=SY8303AIC, RefDes=RefDes, Type=Type, Наименование="SY8303AIC Silergy"
FU1: library part FU, "40А", Manufacturer=Tesla, PartNumber=FT40A.50, ComponentKind=Предохранитель, Наименование="FT40A.50 Tesla"
FU2 FU3: library part FU, "20А", Manufacturer=Littelfuse, PartNumber=0287020L, ComponentKind=Предохранитель, Наименование="0287020L Littelfuse"
FV1: library part FV, Manufacturer=EPCOS, PartNumber=B88069X1380S102, ComponentKind=Разрядник, Наименование="B88069X1380S102 EPCOS"
L1: library part L, Inductance=4,7мкГн, Manufacturer=Bourns, PartNumber=SRP1770TA-4R7M, ComponentKind=Дроссель, Наименование="SRP1770TA-4R7M Bourns"
L2: library part L, Inductance=10мкГн, Manufacturer=Vishay, PartNumber=IHLP2525CZER100M01, ComponentKind=Дроссель, Наименование="IHLP2525CZER100M01 Vishay"
R1: library part R_2W, "Корпус 2512 или 2816", Manufacturer=Pohm, PartNumber=PMR100HZPFV1L00, Power="2 Вт", Resistance=0,001, Tolerance=1%, ComponentKind=Резистор, Type=RC2512, Наименование="PMR100HZPFV1L00 Pohm"
R2 R3 R8 R9 R12 R13 R19 R20: library part R_0,125W, "Корпус 0603", Manufacturer=Yageo, PartNumber=RC0805JR-0710RL, Power="0,125 Вт", Resistance=10, Tolerance=5%, ComponentKind=Резистор, Type=RC0805, Наименование="RC0805JR-0710RL Yageo"
R4 R39: library part R_0,125W, "Корпус 0603", Manufacturer=Yageo, PartNumber=RC0805JR-07100KL, Power="0,125 Вт", Resistance=100к, Tolerance=5%, ComponentKind=Резистор, Type=RC0805, Наименование="RC0805JR-07100KL Yageo"
R5 R10: library part R_0,125W, Manufacturer=Yageo, PartNumber=RC0805JR-0710RL, Power="0,125 Вт", Resistance=10, Tolerance=5%, ComponentKind=Резистор, Type=RC0805, Наименование="RC0805JR-0710RL Yageo"
R6: library part R_2W, "Корпус 2512", Manufacturer="Prosperity Dielectrics", PartNumber=FMF25FPJR003-BH, Power="2 Вт", Resistance=0,003, Tolerance=1%, ComponentKind=Резистор, Type=RC2512, Наименование="FMF25FPJR003-BH Prosperity Dielectrics"
R7 R11 R18: library part R_1W, "Корпус 2512", Manufacturer=TA-I, PartNumber=RLM25FECR002, Power="1 Вт", Resistance=0,002, Tolerance=1%, ComponentKind=Резистор, Type=RC2512, Наименование="RLM25FECR002 TA-I"
R14: library part R_0,125W, "Корпус 0603", Manufacturer=Yageo, PartNumber=RC0805FR-0768KL, Power="0,125 Вт", Resistance=68к, Tolerance=1%, ComponentKind=Резистор, Type=RC0805, Наименование="RC0805FR-0768KL Yageo"
R15 R17: library part R_0,05W, "Корпус 0402", Manufacturer=Yageo, PartNumber=RT0603BRD0710KL, Power="0,05 Вт", Resistance=10к, Tolerance=1%, ComponentKind=Резистор, Type=RC0201, Наименование="RT0603BRD0710KL Yageo"
R16: library part R_0,05W, "Корпус 0402", Manufacturer=Yageo, PartNumber=RC0603FR-0778K7L, Power="0,05 Вт", Resistance=78,7к, Tolerance=1%, ComponentKind=Резистор, Type=RC0201, Наименование="RC0603FR-0778K7L Yageo"
R21: library part R_0,125W, "Корпус 0603", Manufacturer=Yageo, PartNumber=RC0805FR-07100KL, Power="0,125 Вт", Resistance=100к, Tolerance=1%, ComponentKind=Резистор, Type=RC0805, Наименование="RC0805FR-07100KL Yageo"
R22: library part R_0,125W, Manufacturer=Yageo, PartNumber=RC0805FR-07100KL, Power="0,125 Вт", Resistance=100к, Tolerance=1%, ComponentKind=Резистор, Type=RC0805, Наименование="RC0805FR-07100KL Yageo"
R23: library part R_0,5W, "Корпус 1206 (1210)", Manufacturer=Yageo, PartNumber=RC1210FR-0716K9L, Power="0,5 Вт", Resistance=16,9к, Tolerance=1%, ComponentKind=Резистор, Type=RC1210, Наименование="RC1210FR-0716K9L Yageo"
R24: library part R_0,125W, "Корпус 0603", Manufacturer=Yageo, PartNumber=RC0805JR-072KL, Power="0,125 Вт", Resistance=2к, Tolerance=5%, ComponentKind=Резистор, Type=RC0805, Наименование="RC0805JR-072KL Yageo"
R25: library part R_0,5W, "Корпус 1206 (1210)", Manufacturer=Yageo, PartNumber=RC1210JR-0710KL, Power="0,5 Вт", Resistance=10к, Tolerance=5%, ComponentKind=Резистор, Type=RC1210, Наименование="RC1210JR-0710KL Yageo"
R26 R29: library part R_0,125W, Manufacturer=Yageo, PartNumber=RC0805FR-0715K4L, Power="0,125 Вт", Resistance=15,4к, Tolerance=1%, ComponentKind=Резистор, Type=RC0805, Наименование="RC0805FR-0715K4L Yageo"
R27: library part R_0,125W, Manufacturer=Yageo, PartNumber=RC0805FR-0713K3L, Power="0,125 Вт", Resistance=13,3к, Tolerance=1%, ComponentKind=Резистор, Type=RC0805, Наименование="RC0805FR-0713K3L Yageo"
R28: library part R_0,125W, Manufacturer=Yageo, PartNumber=RC0805FR-0719K1L, Power="0,125 Вт", Resistance=19,1к, Tolerance=1%, ComponentKind=Резистор, Type=RC0805, Наименование="RC0805FR-0719K1L Yageo"
R30: library part R_0,125W, "Корпус 0603", Manufacturer=Yageo, PartNumber=RC0805JR-074K7L, Power="0,125 Вт", Resistance=4,7к, Tolerance=5%, ComponentKind=Резистор, Type=RC0805, Наименование="RC0805JR-074K7L Yageo"
R31: library part R_0,125W, Manufacturer=Yageo, PartNumber=RC0805JR-07100KL, Power="0,125 Вт", Resistance=100к, Tolerance=5%, ComponentKind=Резистор, Type=RC0805, Наименование="RC0805JR-07100KL Yageo"
R32 R33 R34 R35: library part R_0,05W, Manufacturer=Yageo, PartNumber=RC0603FR-072K2L, Power="0,05 Вт", Resistance=2,2к, Tolerance=5%, ComponentKind=Резистор, Type=RC0201, Наименование="RC0603FR-072K2L Yageo"
R36: library part R_0,125W, "Корпус 0603", Manufacturer=Yageo, PartNumber=RC0805JR-0710KL, Power="0,125 Вт", Resistance=10к, Tolerance=5%, ComponentKind=Резистор, Type=RC0805, Наименование="RC0805JR-0710KL Yageo"
R37: library part R_0,05W, Manufacturer=Yageo, PartNumber=RT0603BRD0710KL, Power="0,05 Вт", Resistance=10к, Tolerance=5%, ComponentKind=Резистор, Type=RC0201, Наименование="RT0603BRD0710KL Yageo"
R38: library part R_0,125W, "Корпус 0603", Manufacturer=Yageo, PartNumber=RC0805FR-0768K1L, Power="0,125 Вт", Resistance=68,1к, Tolerance=1%, ComponentKind=Резистор, Type=RC0805, Наименование="RC0805FR-0768K1L Yageo"
R40: library part R_0,125W, "Корпус 0603", Manufacturer=Yageo, PartNumber=RC0805FR-0712KL, Power="0,125 Вт", Resistance=12к, Tolerance=1%, ComponentKind=Резистор, Type=RC0805, Наименование="RC0805FR-0712KL Yageo"
R41: library part R_0,125W, Manufacturer=Yageo, PartNumber=RC0805FR-07200KL, Power="0,125 Вт", Resistance=200к, Tolerance=1%, ComponentKind=Резистор, Type=RC0805, Наименование="RC0805FR-07200KL Yageo"
RU1: library part R_U, Manufacturer=Yageo, PartNumber=14D680K, ComponentKind=Варистор, Наименование="14D680K Yageo"
VD1: library part VD_TVS, Manufacturer=Littelfuse, PartNumber=SMCJ51CA, ComponentKind="Диод защитный", Наименование="Диод защитный SMCJ51CA Littelfuse"
VD2: library part VD_TVS, "SMCJ33A", Manufacturer=Hottech, PartNumber=SMCJ30CA, ComponentKind="Диод защитный", Наименование="Диод защитный SMCJ30CA Hottech"
VD3 VD4: library part VD, "1N4148W", Manufacturer="Diotec Semiconductor", ComponentKind=Диод, PartNumber=1N4148W, Наименование="Диод 1N4148W Diotec Semiconductor"
VD5: library part VD, Manufacturer="Diotec Semiconductor", PartNumber=1N4148W, ComponentKind=Диод, Наименование="Диод 1N4148W Diotec Semiconductor"
VT1: library part N_GDS, Manufacturer="Infineon Technologies", PartNumber=IRFS7730TRL7PP, ComponentKind=Транзистор, Наименование="IRFS7730TRL7PP Infineon Technologies"
VT2 VT3 VT4 VT5 VT6 VT7: library part N_GDS, Manufacturer="ON Semiconductor", PartNumber=NTMFS5C628NLT1G, ComponentKind=Транзистор, Наименование="Транзистор NTMFS5C628NLT1G ON Semiconductor"
VT8: library part NPN_BEC, "MMBT5551", Manufacturer="ON Semiconductor", PartNumber=MMBT5551LT1G, ComponentKind=Транзистор, Наименование="Транзистор MMBT5551LT1G ON Semiconductor"
VT9: library part 2N-MOSFET, Manufacturer="Diodes Inc", PartNumber=BSS138DW-7-F, ComponentKind=Транзистор, Наименование="Транзистор BSS138DW-7-F Diodes Inc"
X1: library part X_6, Manufacturer="Degson Electronics", PartNumber=DG78H-A-06P-13-00A(H), ComponentKind=Клеммник, Наименование="DG78H-A-06P-13-00A(H) Degson Electronics"
X2: library part X_14, Manufacturer="Connfly electronic", PartNumber=DS1023-2x7, ComponentKind=Розетка, Наименование="DS1023-2x7 Connfly electronic"

## Free pads (board coordinates)
  round 6 hole 3.2 paste-2539.97 mask+0: ""(61.869,130.394) ""(65.869,172.394) ""(125.369,130.394) ""(125.369,175.394) ""(184.869,172.394) ""(188.869,130.394)
  round 8.4 on Bottom Solder paste-2539.97 mask+0: ""(81.487,145.955) ""(107.63,118.106) ""(160.625,150.45)

## Via types
v1: diameter 0.7, hole 0.4, Top Layer to Bottom Layer, 303 vias
v2: diameter 0.7/0.7 (per signal layer), hole 0.4, Top Layer to Bottom Layer, 45 vias
v3: diameter 0.5, hole 0.2, Top Layer to Bottom Layer, 9 vias
v4: diameter 0.4/0.4 (per signal layer), hole 0.2, Top Layer to Bottom Layer, 9 vias

## Nets (pads, with @x,y where several pads share a name; then routed paths per layer and width w, separated by ;. In a path a pad name is that pad's centre, name@x,y a point inside that pad or via, vN(x,y) a via of type N, cw(c..) or ccw(c..) an arc to the next point about the centre after c; other vN are vias at no path point)
3V3: C1.2 C6.2 C19.2 C30.1 D1.6 D3.1 D3.6 D4.5 D6.2 D6.6 R32.2 R33.2 R34.2 R35.2 | length 120.7
  Top Layer w0.254: D1.6@97.171,171.54 97.18,171.531 97.868,171.531 101.252,168.148 101.252,168.048 C1.2@101.6,167.7 ; 102.991,167.705 103.596,167.1 R34.2@103.596,165.597 ; 105.5,167.7 105.522,167.7 R35.2@106.508,166.714 ; C30.1@168.384,140.063 168.732,139.715 168.833,139.715 171.423,137.125 D6.2@172.8,137.125 ; D6.6@168.4,138.625 168.4,140.047 168.413,140.06 R32.2@171.318,140.06 ; D3.6@169.048,154.408 170.021,154.408 ; R33.2@169.9,155.993 169.718,155.811 169.718,154.711 170.021,154.408 ; C6.2@170.661,150.476 170.661,151.664 ; D3.1@172.8,152.379 171.376,152.379 170.661,151.664 ; 170.021,154.408 170.661,153.768 170.661,151.664
  Top Layer w0.4: C1.2@101.971,167.7 105.5,167.7 116.775,167.7 129.172,155.303 C19.2@132.971,155.303 ; C19.2@132.971,155.378 134.268,156.675 140.75,156.675 144.933,152.492 154.619,152.492 159.801,147.309 166.704,147.309 ; C19.2@133.148,155.48 D4.5@137.182,155.48 ; 166.704,147.304 168.384,145.625 C30.1@168.384,140.063 ; 166.729,147.309 169.745,150.326 170.51,150.326 C6.2@170.661,150.476
4V: C35.1 C36.1 C37.1 L2.2 R38.1 X2.1 | length 32.2
  Top Layer w0.4: C35.1@162.475,171.725 R38.1@160.441,171.725 160.441,166.717 L2.2@160.526,166.632 163.693,166.632 C36.1@163.7,166.625 170.175,166.625 170.625,166.175 170.625,165.925 171.117,165.433 184.774,165.433 X2.1@184.856,165.516
AGND: C1.1 C3.1 C4.2 C6.1 C9.1 C10.1 C11.1 C12.1 C13.1 C14.1 C15.2 C16.2 C18.1 C19.1 C20.1 C21.1 C24.2 C25.2 C26.2 C27.2 C28.1 C29.2 C30.2 C32.2 C33.1 C36.2 C37.2 C38.2 C39.2 D1.1 D1.2 D1.7 D2.2 D3.2 D3.7 D4.2 D5.3 D5.4 D5.8 D5.9 D5.10 D5.15 D5.17 D5.28 D5.41 D6.1 D6.7 D7.6 D8.3 D8.4 FV1.2 pad.@61.869,130.394 pad.@65.869,172.394 pad.@125.369,130.394 pad.@125.369,175.394 pad.@184.869,172.394 pad.@188.869,130.394 R15.2 R16.2 R26.2 R28.2 R31.2 R36.2 R37.2 R40.2 R41.1 RU1.2 VD1.1 VD2.2 VT4.3 VT5.3 VT9.1 VT9.4 X1. X1.2 X1.4 X1.6 X2.14 | length 64.6
  Top Layer w0.254: D2.2@82.075,151 82.088,150.987 83.338,150.987 v2(83.35,150.975) ; D1.7@97.171,171.04 97.162,171.049 96.38,171.049 95.965,171.464 95.965,171.675 96.369,172.079 98.093,172.079 100.132,170.04 D1.2@101.571,170.04 D1.1@101.571,169.54 ; D5.17@107.675,153.225 107.917,153.225 108.258,153.565 ; D5.15@107.675,154.225 107.677,154.223 107.906,154.223 108.258,153.871 ; D5.10@108.325,156.875 D5.9@108.825,156.875 D5.8@109.325,156.875 109.327,156.873 109.327,156.661 109.701,156.287 ; D5.41@109.052,154.387 109.052,154.359 108.258,153.565 ; v4(111.6,151.785) 111.628,151.757 111.628,151.443 111.825,151.246 D5.28@111.825,151.075 ; D5.3@111.825,156.875 D5.4@111.325,156.875 111.325,156.622 110.989,156.287 109.701,156.287 ; VT9.4@114.739,135.27 114.739,135.145 115.284,134.6 R37.2@116.325,134.6 ; C19.1@132.971,153.903 134.982,153.903 C18.1@135.183,154.104 C18.1@135.17,154.091 ; D4.2@137.956,153.102 137.96,153.102 138.133,152.929 D4.2@138.133,152.729 ; D8.4@143.051,170.007 D8.3@143.701,170.007 ; C30.2@166.984,140.063 166.984,138.799 167.649,138.134 168.391,138.134 D6.7@168.4,138.125 169.479,138.125 170.979,136.625 D6.1@172.8,136.625 ; 108.258,153.565 108.258,153.871 ; 108.258,153.871 108.258,155.771 108.774,156.287 109.701,156.287
  Bottom Layer w0.254: v4(111.6,151.785) 111.6,150.908 112.533,149.975 C28.1@112.533,149.725 ; C32.2@119.425,128.294 121.75,128.294 123.849,130.394 pad.@125.369,130.394 ; X2.14@187.396,150.276 188.574,149.098 188.574,130.688 pad.@188.869,130.394
  other v3: 109.475,152.875 110.575,152.875 111.675,152.875 109.475,153.975 110.575,153.975 111.675,153.975 109.475,155.075 110.575,155.075 111.675,155.075
ALERT_1: D1.3 X2.4 | length 101.8
  Top Layer w0.254: D1.3@101.571,170.54 100.628,170.54 99.865,171.303 99.865,172.173 100.505,172.812 103.324,172.812 105.521,170.615 133.84,170.615 137.825,174.599 169.755,174.599 177.012,167.342 187.608,167.342 188.7,166.25 188.7,164.279 X2.4@187.396,162.976
ALERT_2: D3.3 X2.7 | length 13.9
  Top Layer w0.254: D3.3@172.8,153.379 172.809,153.388 173.486,153.388 177.994,157.896 X2.7@184.856,157.896
ALERT_3: D6.3 X2.6 | length 35.2
  Top Layer w0.254: D6.3@172.8,137.625 178.035,137.625 190.414,150.004 190.414,158.729 188.81,160.333 187.499,160.333 X2.6@187.396,160.436
BATT_EN: R30.2 X2.11 | length 77.7
  Top Layer w0.254: R30.2@118.691,128.46 118.691,130.589 121.877,133.775 130.825,133.775 131.098,133.502 154.476,133.502 v2(164.275,143.301) ; v2(172.125,143.301) 172.228,143.301 181.743,152.816 X2.11@184.856,152.816
  Bottom Layer w0.254: v2(164.275,143.301) v2(172.125,143.301)
BATT_IN: FU2.2 R21.1 R22.1 R23.1 VD2.1 VD4.1 VT7.2 | length 44.8
  Top Layer w0.5: VD4.1@106.556,129.227 106.559,129.224 106.559,125.716 R23.1@106.561,125.714 106.561,117.339 109.4,114.5 112.666,114.5 ; R21.1@111.537,116.771 111.552,116.757 111.552,115.614 112.666,114.5 ; R22.1@118.691,116.771 118.691,116.596 120.788,114.5 120.825,114.5 ; v2(132.382,114.5) 120.825,114.5 ; 112.666,114.5 120.825,114.5
BATT_OUT: C11.2 C12.2 C13.2 C14.2 C21.2 D5.36 R18.2 R20.2 VT3.2 | length 86.2
  Top Layer w0.254: D5.36@113.475,154.225 116.013,154.225 116.539,153.698 C21.2@116.539,153.548 ; C21.2@116.539,153.623 116.874,153.288 117.247,153.288 129.955,140.581 129.955,140.414 v2(130.04,140.329) ; v2(146.927,123.943) 147.013,124.028 147.388,124.028 148.017,124.657 148.232,124.657 148.37,124.519 148.586,124.519 148.909,124.842 148.909,125.058 148.417,125.549 148.417,125.765 148.741,126.088 148.956,126.088 149.448,125.596 149.663,125.596 149.987,125.92 149.987,126.135 149.495,126.627 149.495,126.842 149.818,127.166 150.034,127.166 150.525,126.674 150.741,126.674 151.064,126.997 151.064,127.213 150.573,127.704 150.573,127.92 150.896,128.243 151.112,128.243 151.603,127.752 151.819,127.752 152.142,128.075 152.142,128.29 151.65,128.782 151.65,128.998 151.974,129.321 152.189,129.321 152.681,128.829 152.896,128.829 153.22,129.153 153.22,129.368 152.728,129.86 152.728,130.075 153.051,130.398 153.267,130.398 153.405,130.26 153.62,130.26 153.783,130.423 154.038,130.678 162.629,130.678 R20.2@162.95,130.999
  Bottom Layer w0.254: v2(130.04,140.329) 138.794,131.575 154.474,131.575 155.727,132.828 155.727,134.302 156.35,134.925 C11.2@158.25,134.925 ; v2(146.927,123.943) 146.927,126.552 R18.2@146.95,126.575
BATT_SEL: R37.1 VT9.2 VT9.5 X2.10 | length 85.8
  Top Layer w0.254: VT9.2@114.067,132.756 114.067,134.596 ; VT9.5@114.067,135.256 114.067,134.596 ; v2(164.275,144.4) 153.885,134.01 131.308,134.01 131.036,134.283 121.583,134.283 120.45,133.15 R37.1@116.325,133.15 115.513,133.15 114.067,134.596 ; v2(172.125,144.4) 181.838,154.113 186.163,154.113 X2.10@187.396,155.346
  Bottom Layer w0.254: v2(164.275,144.4) v2(172.125,144.4)
CSA: C17.2 D5.22 R12.2 | length 4.7
  Top Layer w0.254: D5.22@108.825,151.075 108.825,149.93 109.245,149.509 C17.2@109.245,148.752 ; C17.2@109.26,148.737 109.26,147.115 R12.2@109.65,146.725
CSB: C17.1 D5.21 R13.2 | length 4.8
  Top Layer w0.254: R13.2@107.325,146.725 107.462,146.725 107.86,147.123 C17.1@107.86,148.737 ; C17.1@107.874,148.751 107.874,149.459 108.325,149.91 D5.21@108.325,151.075
DC/DC_IN: C9.2 C10.2 C15.1 C16.1 C20.2 C38.1 C39.1 D5.18 D5.38 D5.40 D8.5 R6.2 R9.1 R14.1 R39.2 VT2.2 | length 122.4
  Top Layer w0.254: v2(86.3,136.925) 90.442,141.067 90.442,147.929 96.365,153.853 104.838,153.853 v4(104.855,153.87) ; v2@91.524,136.929 92.526,137.93 92.526,148.577 95.434,151.486 99.175,151.486 99.175,151.479 99.807,150.848 R9.1@99.807,150.673 ; v4@104.83,153.853 105.957,152.725 D5.18@107.675,152.725 D5.18@107.677,152.727 ; v4(112.75,155.725) 112.778,155.697 112.778,155.643 113.196,155.225 D5.38@113.475,155.225 118.499,155.225 119.86,156.586 C20.2@119.86,156.661 122.279,156.661 R14.1@122.386,156.553 ; v4@112.75,155.74 113.235,156.225 D5.40@113.475,156.225 ; R39.2@140.606,164.871 140.857,165.121 141.722,165.121 143.07,166.469 143.07,167.288 D8.5@143.051,167.307
  Top Layer w0.4: v2(129.95,156.6) 129.95,156.681 130.056,156.787 C38.1@130.056,164.839 135.689,164.839 C39.1@135.714,164.864 135.721,164.871 R39.2@140.606,164.871
  Bottom Layer w0.25: R6.2@88.904,136.929 v2(91.5,136.929)
  Bottom Layer w0.254: v2(86.3,136.925) R6.2@88.9,136.925 ; v4(104.855,153.87) 104.855,153.909 104.722,154.043 104.722,156.29 105.532,157.1 111.375,157.1 v4(112.75,155.725)
  Bottom Layer w0.4: v4(112.75,155.725) 129.075,155.725 v2(129.95,156.6)
HO1: D5.24 VT3.1 | length 61.8
  Top Layer w0.254: D5.24@109.825,151.075 109.825,150.474 111.269,149.03 111.269,142.788 115.943,138.114 133.039,138.114 142.117,147.193 147.013,147.193 153.655,140.551 v2(153.655,139.64)
  Bottom Layer w0.25: VT3.1@153.655,138.44 v2(153.655,139.64)
HO2: D5.32 VT2.1 | length 16.9
  Top Layer w0.254: D5.32@113.475,152.225 113.744,152.225 116.953,149.016 116.953,139.626 v2(116.913,139.586)
  Bottom Layer w0.254: VT2.1@114.85,138.44 114.85,138.554 115.104,138.808 115.151,138.808 115.929,139.586 v2(116.913,139.586)
ISNSN: C8.1 D5.19 R8.2 | length 6.4
  Top Layer w0.254: R8.2@101.657,152.761 102.009,152.409 104.297,152.409 C8.1@104.432,152.544 104.456,152.52 105.253,152.52 105.548,152.225 D5.19@107.675,152.225
ISNSP: C8.2 D5.20 R9.2 | length 6.4
  Top Layer w0.254: R9.2@101.657,150.673 102.021,151.037 104.326,151.037 C8.2@104.432,151.144 ; C8.2@104.373,151.084 104.61,151.322 105.14,151.322 105.542,151.725 D5.20@107.502,151.725
LO1: D5.27 VT5.1 | length 58
  Top Layer w0.254: D5.27@111.325,151.075 111.325,149.648 111.75,149.223 111.75,143.02 116.218,138.552 132.782,138.552 144.318,150.088 153.618,150.088 v2(153.655,150.125)
  Bottom Layer w0.25: VT5.1@153.655,148.893 v2(153.655,150.125)
LO2: D5.30 VT4.1 | length 7
  Top Layer w0.254: D5.30@112.825,151.075 112.825,149.932 116.025,146.732 v2(116.116,146.732)
  Bottom Layer w0.254: VT4.1@114.854,146.736 v2@116.112,146.736
  Bottom Layer w0.4: VT4.1@114.85,146.74 VT4.1@114.854,146.736
MODE: D5.7 X2.5 | length 85.7
  Top Layer w0.254: D5.7@109.825,156.875 v2@109.825,164.75
  Bottom Layer w0.254: v2(109.825,165.079) 109.864,165.039 112.823,165.039 113.547,165.764 179.976,165.764 184.486,161.254 184.486,161.164 184.856,160.793 X2.5@184.856,160.436
NetC2_1: C2.1 D2.1 | length 6.2
  Top Layer w0.254: C2.1@81.725,144.948 81.725,145.023 83.11,146.408 83.11,149.17 82.378,149.902 82.223,149.902 D2.1@82.075,150.05
NetC2_2: C2.2 C3.2 D2.6 FU1.2 FV1.1 R4.1 RU1.1 VD1.2 VT1.3 | length 13.4
  Top Layer w0.4: v1(73.5,141) 76.127,141 79.875,144.748 79.95,144.748 80.075,144.873 C2.2@80.075,144.948 80.075,147.425 R4.1@79.975,147.525 ; D2.6@79.675,150.05 79.702,150.05 79.777,149.975 79.777,147.898 R4.1@79.975,147.7
  other v1: 72,129 73.5,129 75,129 76.5,129 71.25,130.5 72.75,130.5 74.25,130.5 75.75,130.5 72,132 73.5,132 75,132 76.5,132 69.75,133.5 71.25,133.5 72.75,133.5 74.25,133.5 75.75,133.5 69,135 70.5,135 72,135 73.5,135 75,135 76.5,135 68.25,136.5 69.75,136.5 71.25,136.5 72.75,136.5 74.25,136.5 75.75,136.5 67.5,138 69,138 70.5,138 72,138 73.5,138 75,138 66.75,139.5 68.25,139.5 69.75,139.5 71.25,139.5 72.75,139.5 67.5,141 69,141 70.5,141 72,141
NetC4_1: C4.1 D1.8 D2.4 R1.1 R2.1 VT1.2 | length 55.1
  Top Layer w0.254: v1(77.25,156) 77.25,155.88 79.402,153.728 79.402,152.098 79.55,151.95 D2.4@79.675,151.95 ; v2(86.434,154.358) 86.434,155.553 86.285,155.702 86.068,155.702 85.934,155.836 85.934,156.103 86.068,156.236 86.801,156.236 86.934,156.37 86.934,156.637 86.801,156.77 86.068,156.77 85.934,156.904 85.934,157.171 86.068,157.304 86.801,157.304 86.934,157.438 86.934,157.705 86.801,157.838 86.068,157.838 85.934,157.972 85.934,158.239 86.068,158.372 86.801,158.372 86.934,158.506 86.934,158.773 86.801,158.906 86.068,158.906 85.934,159.04 85.934,159.307 86.068,159.44 86.801,159.44 86.934,159.574 86.934,159.841 86.801,159.974 86.068,159.974 85.934,160.108 85.934,160.375 86.068,160.508 86.801,160.508 86.934,160.642 86.934,160.909 86.801,161.042 86.583,161.042 86.434,161.191 86.434,161.839 86.434,165.523 89.656,168.744 R2.1@90.75,168.744 ; v2(91.467,154.358) 91.486,154.377 91.486,162.504 98.268,169.286 98.268,170.17 97.906,170.531 97.18,170.531 D1.8@97.171,170.54
  Bottom Layer w0.25: v2(86.434,154.358) R1.1@88.883,154.358
  Bottom Layer w0.254: R1.1@88.884,154.358 v2(91.467,154.358)
  other v1: 78,157.5 79.5,157.5 81,157.5 82.5,157.5 77.25,159 78.75,159 80.25,159 81.75,159 83.25,159 66,160.5 67.5,160.5 69,160.5 70.5,160.5 72,160.5 73.5,160.5 75,160.5 76.5,160.5 78,160.5 79.5,160.5
NetC5_1: C5.1 D1.10 R2.2 | length 5.2
  Top Layer w0.254: R2.2@92.6,168.744 92.6,168.813 92.998,169.211 94.587,169.211 C5.1@94.87,168.928 95.277,169.335 95.802,169.335 96.007,169.54 D1.10@97.171,169.54
NetC5_2: C5.2 D1.9 R3.1 | length 5.2
  Top Layer w0.254: R3.1@92.6,170.724 92.6,170.643 92.998,170.245 94.536,170.245 C5.2@94.87,170.578 95.211,170.237 95.802,170.237 95.991,170.049 97.162,170.049 D1.9@97.171,170.04
NetC7_1: C7.1 D3.10 R5.2 | length 5.5
  Top Layer w0.254: R5.2@163.729,151.091 163.729,151.174 164.127,151.572 165.84,151.572 C7.1@166.194,151.217 166.269,151.217 167.422,152.37 168.384,152.37 D3.10@168.386,152.368
NetC7_2: C7.2 D3.9 R10.2 | length 5.1
  Top Layer w0.254: R10.2@163.729,153.106 163.729,152.982 164.127,152.584 165.91,152.584 C7.2@166.194,152.867 166.206,152.879 D3.9@168.4,152.879
NetC22_1: C22.1 D5.25 | length 3.2
  Top Layer w0.254: D5.25@110.325,151.075 v4(110.325,151.785)
  Bottom Layer w0.254: C22.1@109.805,149.525 109.909,149.629 109.909,151.369 v4(110.325,151.785)
NetC23_1: C23.1 D5.31 | length 3.5
  Top Layer w0.254: v4(112.744,152.311) 112.772,152.283 112.772,152.208 113.255,151.725 D5.31@113.475,151.725
  Bottom Layer w0.254: v4@112.751,152.304 114.684,152.304 C23.1@115.089,151.898
NetC24_1: C24.1 D5.2 | length 3.2
  Top Layer w0.254: D5.2@112.325,156.875 112.325,157.091 113.431,158.197 113.431,159.456 C24.1@113.525,159.55
NetC25_1: C25.1 D5.16 | length 4
  Top Layer w0.254: C25.1@104.357,155.328 104.38,155.306 105.452,155.306 107.033,153.725 D5.16@107.675,153.725
NetC27_1: C27.1 R17.2 | length 2.6
  Top Layer w0.254: C27.1@100.342,157.925 R17.2@102.932,157.925
NetC28_2: C28.2 D5.14 D5.29 | length 12.9
  Top Layer w0.254: v4(106.9,154.725) D5.14@107.675,154.725 ; v4(112.25,151.8) 112.25,151.76 112.323,151.687 112.323,151.077 D5.29@112.325,151.075
  Bottom Layer w0.254: v4(106.9,154.725) 106.9,153.255 107.942,152.214 111.836,152.214 v4(112.25,151.8) 112.278,151.772 112.563,151.772 114.442,149.893 115.215,149.893 C28.2@115.383,149.725
NetC29_1: C29.1 D5.13 R17.1 | length 6.7
  Top Layer w0.254: C29.1@104.357,160.194 104.357,157.95 R17.1@104.382,157.925 107.083,155.225 D5.13@107.675,155.225